# Altium PCB OpenRex_V1I1_PCB.PcbDoc (part 10 of 12)
Units mm, origin at the board's own origin, x right, y up, seen from the top; angles counter-clockwise.
Board outline 70 x 95 mm, 10 copper layers (L1, L2, L3, L4 (PWR), L5 (PWR), L6 (PWR), L7 (PWR), L8, L9, L10), stack 1.632 mm thick; 1080 components, 708 nets, 3831 pads, 2373 vias.
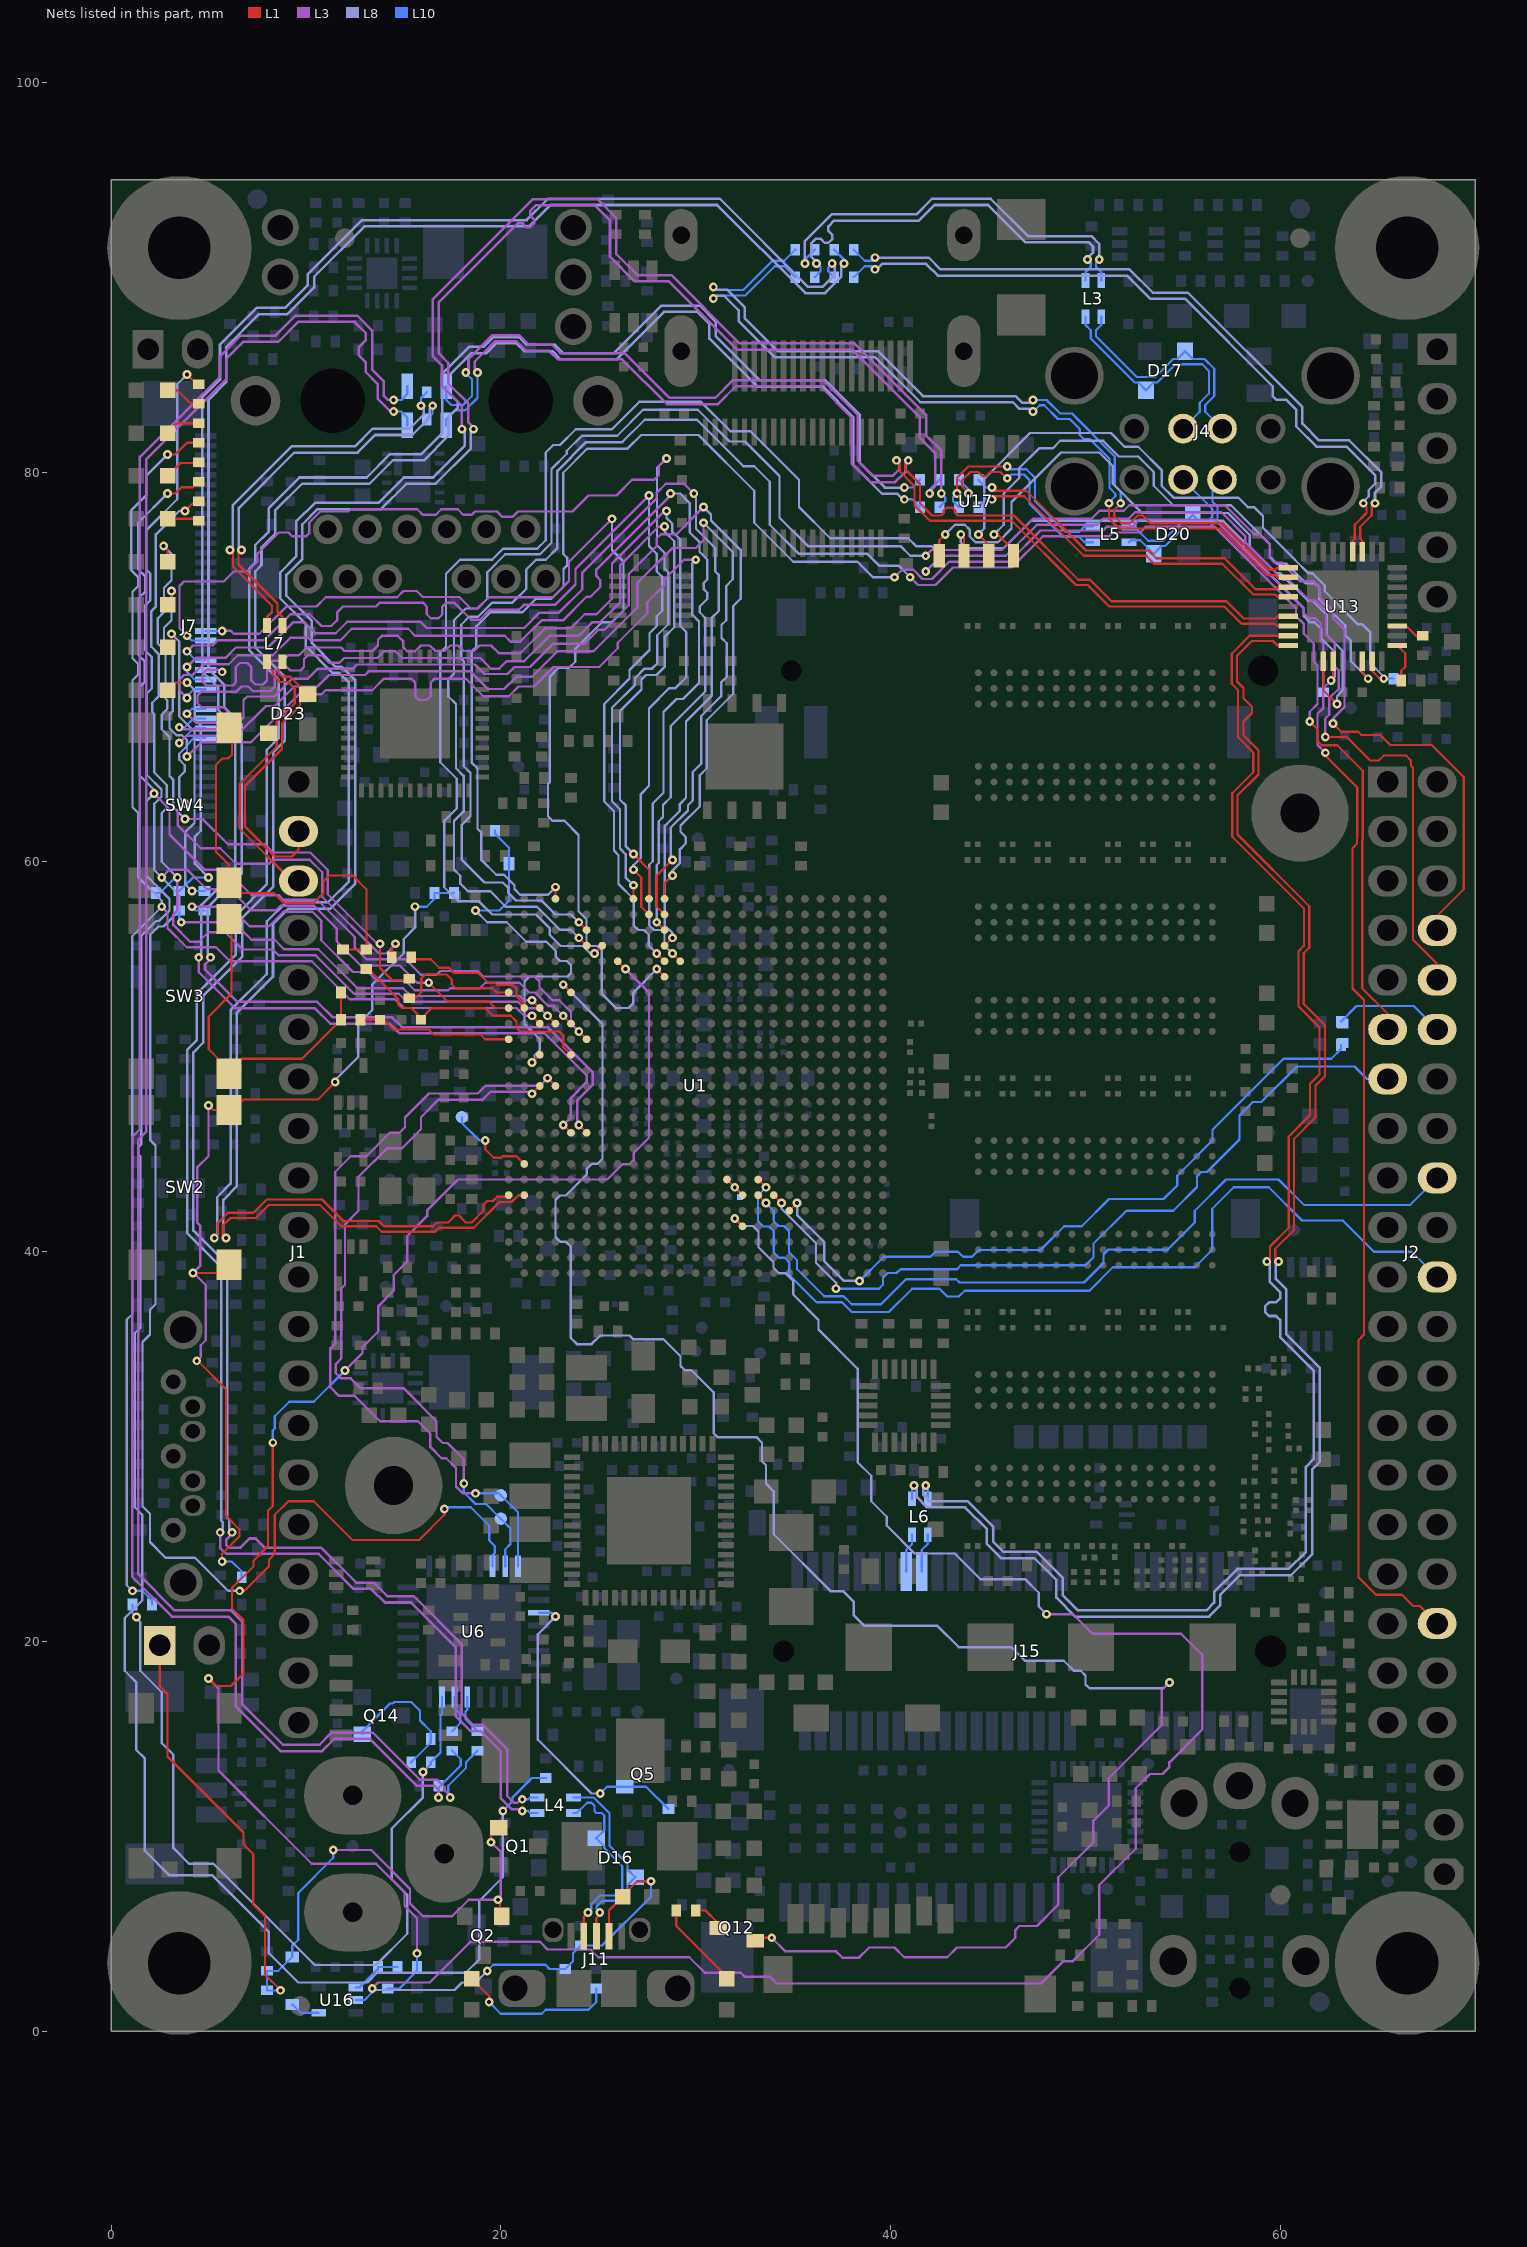
[diagram p18: the nets of this part, all layers, seen from the top]

## Via types
v1: diameter 0.45, hole 0.2, L1 to L10, tented both sides, 2369 vias
v2: diameter 1, hole 0.5, L1 to L10, tented top, 4 vias

## Nets (pads, with @x,y where several pads share a name; then routed paths per layer and width w, separated by ;. In a path a pad name is that pad's centre, name@x,y a point inside that pad or via, vN(x,y) a via of type N, cw(c..) or ccw(c..) an arc to the next point about the centre after c; other vN are vias at no path point) (continued)
UART2_RXD: TP30.1 U1.D13 U6.32 | length 40.9
  L1 w0.114: v1(22.4,48.9) U1.D13@22.8,48.5
  L3 w0.12: v1(18.7,27.6) 18.056,27.6 17.702,27.954 17.702,28.898 17.2,29.4 16.956,29.4 16.385,29.971 16.385,30.659 15.744,31.3 13.8,31.3 12.5,32.6 11.7,32.6 11.255,33.045 11.255,35.047 11.5,35.292 11.5,44.1 12.3,44.9 13.1,44.9 14.3,46.1 14.8,46.1 15.085,46.385 15.085,46.885 16.315,48.115 18.815,48.115 19.215,48.515 22.015,48.515 v1(22.4,48.9)
  L10 w0.114: v1(18.7,27.6) 19.9,27.6 TP30.1@20,27.5 20.875,26.625 U6.32@20.875,23.85
UART2_TXD: TP29.1 U1.C13 U6.31 | length 38
  L1 w0.114: v1(21.6,48.1) U1.C13@22,48.5
  L3 w0.12: v1(18.1,28.1) 18.1,29.344 17.259,30.185 17.015,30.185 16.7,30.5 16.7,31.3 15,33 12.8,33 12.3,33.5 11.8,33.5 11.535,33.765 11.535,34.235 11.815,34.515 11.815,38.115 12,38.3 12,41.4 12.7,42.1 12.7,43.844 14.156,45.3 14.914,45.3 15.9,46.286 15.9,46.9 16.8,47.8 19.068,47.8 19.47,48.202 21.498,48.202 v1(21.6,48.1)
  L10 w0.114: v1(18.1,28.1) 18.1,27.656 18.7,27.056 19.244,27.056 TP29.1@20,26.3 20.5,25.8 20.5,25 20.225,24.725 U6.31@20.225,23.85
UART3_CTS: J2.36 U1.D25 | length 132.1
  L1 w0.114: U1.D25@22.8,58.1 v1(22.8,58.7) ; v1(62.3,65.6) 62.3,65.456 63.94,63.816 63.94,61.282 63.92,61.262 63.92,60.924 63.7,60.704 63.7,53.5 64.285,52.915 64.285,35.745 64,35.46 64,23.3 64.9,22.4 66.23,22.4 66.815,21.815 67.145,21.815 J2.36@68.04,20.92
  L3 w0.12: v1(40.2,74.6) 40.585,74.985 41.171,74.985 41.641,74.515 42.115,74.515 43,75.4 46.083,75.4 47.683,77 50.9,77 51.1,77.2 52.4,77.2 52.767,77.567 56.637,77.567 61.2,73.004 61.2,72.756 61.456,72.5 61.8,72.5 62.056,72.244 62.056,71.344 62.2,71.2 62.2,67.9 61.9,67.6 61.9,66 v1(62.3,65.6)
  L8 w0.12: v1(22.8,58.7) 22.415,58.315 20.985,58.315 20.7,58.6 20.7,58.8 20.16,59.34 19.76,59.34 19,60.1 19,61.5 18.8,61.7 18.8,64.8 18.5,65.1 18.5,70.806 18.735,71.041 18.735,72.079 19.456,72.8 21.1,72.8 21.8,73.5 22.6,73.5 23.218,74.118 23.218,75.018 23.4,75.2 23.4,75.6 23.2,75.8 23.2,79.964 24.436,81.2 26.5,81.2 27.2,81.9 30.144,81.9 33,79.044 33,77.4 35,75.4 38.3,75.4 39.1,74.6 v1(40.2,74.6)
UART3_RTS: J2.11 U1.F23 | length 102.7
  L1 w0.114: v1(24,56.9) U1.F23@24.4,56.5 ; v1(61.5,67.2) 61.9,66.8 61.9,66.2 62.115,65.985 62.915,65.985 64.22,64.68 64.22,61.166 64.2,61.146 64.2,53.5 65.5,52.2 J2.11@65.5,51.4
  L3 w0.12: v1(41,74.6) 41.4,74.2 42.3,74.2 43.2,75.1 46.2,75.1 47.8,76.7 51.2,76.7 51.4,76.9 52.8,76.9 53.1,77.2 56.608,77.2 60.8,73.008 60.8,72.6 61.2,72.2 61.2,71.7 61.71,71.19 61.71,70.28 61.9,70.09 61.9,68.1 61.5,67.7 v1(61.5,67.2)
  L8 w0.12: v1(24,56.9) 23.6,57.3 22.8,57.3 22.08,58.02 20.78,58.02 20.385,58.415 20.385,58.659 20.1,58.944 19.156,58.944 18,60.1 18,61.9 18.445,62.345 18.445,64.555 18.1,64.9 18.1,70.3 17.965,70.435 17.965,72.165 18.37,72.57 18.83,72.57 19.56,73.3 20.6,73.3 21.3,74 21.3,75 21.8,75.5 22.3,75.5 22.9,76.1 22.9,80.06 24.374,81.533 26.233,81.533 27.385,82.685 30.059,82.685 32.444,80.3 33,80.3 33.8,79.5 33.8,77.3 35.3,75.8 38.804,75.8 39.404,75.2 40.4,75.2 v1(41,74.6)
UART3_RXD: J2.10 U1.G22 | length 111.4
  L1 w0.114: v1(24.8,55.3) U1.G22@25.2,55.7 ; v1(62.3,66.4) 63.4,66.4 64.6,65.2 65.044,65.2 65.294,65.45 66.45,65.45 66.7,65.2 66.7,64.926 66.8,64.826 66.8,56 68.04,54.76 J2.10@68.04,53.94
  L3 w0.12: v1(41.8,74.9) 42.6,75.7 45.9,75.7 47.5,77.3 50.6,77.3 50.9,77.6 52.2,77.6 52.533,77.933 56.967,77.933 58.185,76.715 58.185,76.415 60.127,74.473 60.427,74.473 61.5,73.4 61.8,73.4 62.336,72.864 62.336,71.664 62.793,71.207 62.793,70.007 62.985,69.815 62.985,68.885 62.5,68.4 62.5,67.552 62.3,67.352 v1(62.3,66.4)
  L8 w0.12: v1(24.8,55.3) 24.59,55.3 24.205,55.685 23.071,55.685 22.5,56.256 22.5,56.6 21.8,57.3 19.556,57.3 18.885,57.971 18.885,57.985 17.815,57.985 17.1,58.7 17.1,62.1 17.735,62.735 17.735,64.265 16.895,65.105 16.895,70.751 17.185,71.041 17.185,74.785 17.9,75.5 19.551,75.5 20.111,76.06 21.86,76.06 22.3,76.5 22.3,81 22.685,81.385 23.029,81.385 23.844,82.2 25.7,82.2 27.1,83.6 30.267,83.6 31.767,82.1 32.8,82.1 35.3,79.6 35.3,78.2 36.9,76.6 40.9,76.6 41.3,76.2 42.1,76.2 42.3,76 42.3,75.4 v1(41.8,74.9)
UART3_TXD: J2.8 U1.F22 | length 105.7
  L1 w0.114: v1(24,56.1) U1.F22@24.4,55.7 ; v1(62.7,67.1) 63.12,66.68 63.976,66.68 64.141,66.515 65.111,66.515 65.626,66 67.756,66 69.4,64.356 69.4,58.6 68.04,57.24 J2.8@68.04,56.48
  L3 w0.12: v1(41.8,75.7) 42.1,76 45.7,76 47.3,77.6 50.3,77.6 50.715,78.015 51.959,78.015 52.244,78.3 57.155,78.3 58.655,76.8 58.944,76.8 59.456,76.289 59.456,75.6 59.7,75.356 60.044,75.356 61,74.4 61.7,74.4 62,74.1 62,73.6 62.7,72.9 62.7,72.5 63.285,71.915 63.285,67.941 62.7,67.356 v1(62.7,67.1)
  L8 w0.12: v1(24,56.1) 23.585,56.515 23.041,56.515 21.856,57.7 20.256,57.7 19.456,58.5 18.3,58.5 17.915,58.885 17.915,59.285 17.6,59.6 17.6,62.1 18.09,62.59 18.09,64.41 17.7,64.8 17.7,68.1 17.3,68.5 17.3,69.35 17.6,69.65 17.6,72.4 18.2,73 18.8,73 19.3,73.5 19.3,74.853 20.227,75.78 22.007,75.78 22.6,76.373 22.6,80.156 23.385,80.941 23.385,81.089 24.163,81.867 25.967,81.867 27.3,83.2 30.1,83.2 31.732,81.568 32.532,81.568 34.3,79.8 34.3,77.656 35.756,76.2 40.5,76.2 41,75.7 v1(41.8,75.7)
UART4_RXD: J2.13 U1.V6 | length 41.1
  L1 w0.114: U1.V6@34,42.9 v1(34.4,42.5)
  L8 w0.12: v1(34.4,42.5) 34.4,42.2 36.168,40.432 36.168,39.432 37.2,38.4 v1(37.2,38.1)
  L10 w0.114: v1(37.2,38.1) 39.4,38.1 39.6,38.3 39.6,38.644 39.856,38.9 40.3,38.9 40.5,39.1 43.4,39.1 43.6,39.3 50,39.3 50.4,39.7 50.4,40.4 52.1,42.1 54.5,42.1 55.715,43.315 55.715,43.859 55.941,44.085 56.229,44.085 57.9,45.756 57.9,46.994 58.591,47.685 59.029,47.685 60.844,49.5 63.8,49.5 64.44,48.86 J2.13@65.5,48.86
UART4_TXD: R366.1 R367.1 U1.W5 | length 37
  L1 w0.114: U1.W5@34.8,42.1 v1(35.2,42.5)
  L8 w0.12: v1(35.2,42.5) 35.2,41.88 36.6,40.48 36.6,39.5 37.6,38.5 v1(38.4,38.5)
  L10 w0.114: v1(38.4,38.5) 39.64,39.74 42.04,39.74 42.3,40 43.456,40 43.716,39.74 44.17,39.74 44.515,40.085 47.685,40.085 48.9,41.3 49.8,41.3 51.2,42.7 54,42.7 54.7,43.4 54.7,43.9 56.515,45.715 56.515,46.259 60.156,49.9 62.6,49.9 63.1,50.4 R367.1@63.1,50.6
UART4_TXD_R: J2.12 R366.2 R368.2 | length 5.8
  L10 w0.114: R368.2@63.1,51.8 63.9,52.6 66.84,52.6 J2.12@68.04,51.4
UART5_RXD: J2.18 U1.U6 | length 42.9
  L1 w0.114: U1.U6@33.2,42.9 v1(33.6,42.5)
  L10 w0.114: v1(33.6,42.5) 34,42.1 34,41.6 34.015,41.585 34.015,41.541 34.241,41.315 34.529,41.315 34.785,41.059 34.785,39.971 35.2,39.556 35.2,39.1 36.585,37.715 37.585,37.715 38,37.3 39.5,37.3 40.785,38.585 43.359,38.585 43.529,38.415 49.915,38.415 50.915,39.415 50.915,39.859 51.17,40.115 51.459,40.115 51.474,40.1 54.2,40.1 55.6,41.5 55.6,42.1 57.2,43.7 59.9,43.7 61.2,42.4 66.66,42.4 J2.18@68.04,43.78
UART5_TXD: J2.22 U1.U7 | length 46.4
  L1 w0.114: U1.U7@33.2,43.7 v1(33.6,43.3)
  L10 w0.114: v1(33.6,43.3) 33.2,42.9 33.2,41.556 33.471,41.285 33.759,41.285 34,41.044 34,39.956 34.271,39.685 34.559,39.685 34.8,39.444 34.8,38.8 36.2,37.4 37.5,37.4 38,36.9 39.9,36.9 41.1,38.1 42.5,38.1 42.9,37.7 43.5,37.7 43.8,38 50.2,38 51.4,39.2 55.6,39.2 56.5,40.1 56.5,42.2 57.6,43.3 59.4,43.3 61.1,41.6 63.2,41.6 64.8,40 66.74,40 J2.22@68.04,38.7
USB0_CHD: TP26.1 U1.B8 | length 4.7
  L1 w0.114: v1(19.2,45.7) 19.2,45.256 19.641,44.815 20.015,44.815 20.1,44.9 20.8,44.9 U1.B8@21.2,44.5
  L10 w0.114: TP26.1@18,46.9 18,46.6 18.9,45.7 v1(19.2,45.7)
USB0_ID: D19.1 J11.4 R198.1 R199.2 U1.T4 U16.2 | length 119.4
  L1 w0.114: J11.4@25.55,4.875 25.55,6.2 D19.1@26.25,6.9 26.25,6.95 27,7.7 v1(27.7,7.7) ; v1(32,41.7) U1.T4@32.4,41.3
  L3 w0.12: v1(13.4,2.2) 13.7,2.5 16.356,2.5 18.456,4.6 22,4.6 22.4,4.2 24.6,4.2 25,3.8 29.668,3.8 30.468,3 32.305,3 32.5,2.805 33.795,2.805 34.15,2.45 47.71,2.45 48.86,3.6 49.344,3.6 50.7,4.956 50.7,7.5 52.569,9.369 52.569,12.469 53.3,13.2 53.944,13.2 54.3,13.556 54.3,13.796 55.985,15.481 55.985,19.315 54.9,20.4 50.355,20.4 49.355,21.4 v1(48,21.4)
  L8 w0.12: v1(13.4,2.2) 13.485,2.115 17.615,2.115 18,2.5 18.7,2.5 v1(19.3,3.1) ; v1(32,41.7) 32.385,41.315 32.929,41.315 33.215,41.029 33.215,40.229 33.985,39.459 33.985,39.171 34.256,38.9 34.6,38.9 35,38.5 35,37.8 36.3,36.5 36.3,36 38.315,33.985 38.315,29.185 39,28.5 39,27.196 39.8,26.396 39.8,25.944 41.229,24.515 43.285,24.515 44.6,23.2 46.896,23.2 47.6,22.496 47.6,21.8 v1(48,21.4)
  L10 w0.114: U16.2@12.55,1.6 13,1.6 13.4,2 v1(13.4,2.2) ; v1(19.3,3.1) 19.615,3.415 22.285,3.415 22.5,3.2 R199.2@23.3,3.2 23.7,3.6 23.7,4 R198.1@24.1,4.4 25.194,4.4 27.7,6.906 v1(27.7,7.7)
USB0_ID_BUFF: D27.1 U16.4 | length 1.5
  L10 w0.114: D27.1@9.3,1.381 9.731,0.95 U16.4@10.65,0.95
USB0_ID_BUFF_EN: R304.2 R305.2 U1.H21 | length 77.2
  L1 w0.114: v1(5,18.1) 5.385,17.715 6.159,17.715 6.8,18.356 6.8,21.1 6.2,21.7 6.2,22.744 7.315,23.859 7.315,24.159 8.05,24.894 8.05,26.706 8.3,26.956 v1(8.3,30.2) ; U1.H21@26,54.9 v1(26.4,54.5)
  L3 w0.12: v1(5,18.1) 5.515,17.585 5.515,13.385 10.3,8.6 13.6,8.6 15.06,7.14 15.06,6.444 15.7,5.804 v1(15.7,4) ; v1(12,33.9) 12.9,34.8 12.9,35.1 13.715,35.915 13.715,37.215 14.5,38 14.5,38.8 15.195,39.495 15.195,40.805 16.215,41.825 16.215,42.115 17.8,43.7 25.456,43.7 26.241,44.485 26.585,44.485 26.815,44.715 26.815,45.059 27.6,45.844 27.6,53.3 v1(26.4,54.5)
  L10 w0.114: v1(8.3,30.2) 8.3,30.828 8.4,30.928 8.4,31.556 9.144,32.3 10.4,32.3 v1(12,33.9) ; R305.2@14.2,2.2 14.8,2.2 15.7,3.1 R304.2@15.7,3.3 v1(15.7,4)
USB0_ID_BUFF_EN_R: R155.1 R304.1 U16.1 | length 2.6
  L10 w0.114: U16.1@12.55,2.25 12.75,2.25 13.7,3.2 R155.1@13.7,3.3 R304.1@14.7,3.3
USB0_N: R322.2 R323.2 U1.B6 | length 117.6
  L1 w0.114: v1(5.9,40.7) 5.737,40.863 5.737,41.337 6.126,41.726 7.426,41.726 8.1,42.4 10.713,42.4 11.813,41.3 13.613,41.3 13.887,41.026 16.626,41.026 16.826,41.226 18.613,41.226 19.93,42.543 20.548,42.543 20.905,42.9 U1.B6@21.2,42.9
  L3 w0.13: v1(18.6,82.2) 18.6,82.279 18.32,82.559 18.32,83.533 17.3,84.553 17.3,85.604 16.82,86.084 16.82,88.72 20.872,92.772 21.1,92.772 21.304,92.568 21.504,92.568 21.704,92.768 21.704,92.968 21.5,93.172 21.5,93.4 21.78,93.68 24.82,93.68 25.6,92.9 25.6,91.047 26.867,89.78 28.62,89.78 32.12,86.28 38.02,86.28 41.5,82.8 41.5,81.747 42.28,80.967 42.28,79.259 42,78.979 v1(42,78.9)
  L8 w0.13: v1(5.9,40.7) 5.76,40.84 5.76,42.66 6.46,43.36 6.46,52.26 8.31,54.11 8.31,56.81 9.1,57.6 11.253,57.6 12.52,58.867 12.52,69.333 11.833,70.02 11.5,70.02 10.3,71.22 10.3,72.353 9,73.653 9,74.72 9.82,75.54 9.82,77.32 10.6,78.1 13.853,78.1 15.153,79.4 16.653,79.4 18.46,81.207 18.46,82.06 v1(18.6,82.2)
  L10 w0.114: v1(42,78.9) 42,79.1 R323.2@42.5,79.6
USB0_OTG_L_N: D16.2 J11.2 L4.2 | length 10.4
  L1 w0.114: J11.2@24.25,4.875 24.25,5.875 v1(24.475,6.1)
  L10 w0.114: L4.2@23.725,11.2 23.9,11.2 24.426,11.726 24.646,11.726 24.8,11.572 24.8,11.3 24.9,11.2 25.172,11.2 25.3,11.072 25.3,10.3 D16.2@24.9,9.9 25.3,9.5 25.3,9.4 26.226,8.474 26.226,7.313 25.887,6.974 25.099,6.974 24.638,6.513 24.638,6.263 v1(24.475,6.1)
USB0_OTG_L_P: D16.4 J11.3 L4.1 | length 10.5
  L1 w0.114: J11.3@24.9,4.875 24.9,5.797 25.075,5.972 v1(25.075,6.1)
  L10 w0.114: L4.1@23.725,12 24.76,12 25.574,11.186 25.574,9.513 26.5,8.587 26.5,8.3 D16.4@26.9,7.9 26.5,7.5 26.5,7.2 26,6.7 25.212,6.7 24.912,6.4 24.912,6.263 v1(25.075,6.1)
USB0_OTG_N: L4.3 R323.1 | length 128.6
  L3 w0.13: v1(5.6,25.6) 5.6,24.8 5.9,24.5 10.647,24.5 12.447,22.7 13.347,22.7 14.047,22 15.4,22 17.68,19.72 17.68,16.167 18.447,15.4 18.947,15.4 20,14.347 20,11.952 20.552,11.4 21,11.4 v1(21.1,11.3)
  L8 w0.13: v1(5.6,25.6) 5.74,25.74 5.74,26.112 5.646,26.206 5.646,39.205 3.9,40.952 3.9,50.353 4.4,50.853 4.4,53.253 6.4,55.253 6.4,57.253 8,58.853 8,65.753 8.6,66.353 8.6,69.347 7.08,70.867 7.08,75.033 7.4,75.353 7.4,76.253 8.1,76.953 8.1,78.153 9.667,79.72 13.12,79.72 14.32,80.92 15.92,80.92 17,82 17,85.053 18.367,86.42 19.12,86.42 19.62,86.92 20.933,86.92 21.333,86.52 22.78,86.52 23.2,86.1 25.8,86.1 28.235,88.535 30.218,88.535 31.02,87.733 31.02,86.98 33.3,84.7 36.653,84.7 38.41,82.943 38.41,80.49 39.7,79.2 v1(40.7,79.2)
  L10 w0.114: v1(21.1,11.3) 21.41,11.3 21.51,11.2 L4.3@21.875,11.2 ; v1(40.7,79.2) 41.1,79.2 R323.1@41.5,79.6
USB0_OTG_P: L4.4 R326.1 | length 128.6
  L3 w0.13: v1(6.2,25.6) 6.2,25.521 5.92,25.241 5.92,24.933 6.033,24.82 6.645,24.82 7.108,25.283 7.417,25.283 7.88,24.82 10.78,24.82 12.58,23.02 13.48,23.02 14.18,22.32 15.533,22.32 18,19.853 18,16.3 18.58,15.72 19.08,15.72 20.32,14.48 20.32,12.084 20.684,11.72 20.841,11.72 21.021,11.9 v1(21.1,11.9)
  L8 w0.13: v1(6.2,25.6) 6.06,25.74 6.06,26.244 5.966,26.338 5.966,39.338 4.22,41.084 4.22,50.22 4.72,50.72 4.72,53.12 6.72,55.12 6.72,57.12 8.32,58.72 8.32,65.62 8.92,66.22 8.92,69.48 7.4,71 7.4,74.9 7.72,75.22 7.72,76.12 8.42,76.82 8.42,78.02 9.8,79.4 13.253,79.4 14.453,80.6 16.053,80.6 17.32,81.867 17.32,82.82 17.8,83.3 17.8,83.6 17.32,84.08 17.32,84.92 18.5,86.1 19.253,86.1 19.753,86.6 20.8,86.6 21.2,86.2 22.647,86.2 23.067,85.78 25.933,85.78 28.368,88.215 30.085,88.215 30.7,87.6 30.7,86.847 33.167,84.38 36.52,84.38 38.09,82.81 38.09,80.357 39.567,78.88 40.341,78.88 40.621,78.6 v1(40.7,78.6)
  L10 w0.114: v1(21.1,11.9) 21.41,11.9 21.51,12 L4.4@21.875,12 ; v1(40.7,78.6) 41.1,78.6 R326.1@41.5,78.2
USB0_P: R325.2 R326.2 U1.A6 | length 117.6
  L1 w0.114: v1(5.3,40.7) 5.463,40.863 5.463,41.45 6.013,42 7.313,42 7.987,42.674 10.826,42.674 11.926,41.574 13.726,41.574 14,41.3 16.513,41.3 16.713,41.5 17.3,41.5 17.65,41.85 17.85,41.85 18.2,41.5 18.5,41.5 19.1,42.1 19.1,42.4 19.3,42.6 19.6,42.6 19.817,42.817 20.317,42.817 U1.A6@20.4,42.9
  L3 w0.13: v1(18,82.2) 18,83.4 16.98,84.42 16.98,85.472 16.5,85.952 16.5,88.853 21.647,94 24.953,94 25.92,93.033 25.92,91.18 27,90.1 28.753,90.1 32.253,86.6 38.153,86.6 41.82,82.933 41.82,81.88 42.6,81.1 v1(42.6,78.9)
  L8 w0.13: v1(5.3,40.7) 5.44,40.84 5.44,42.793 6.14,43.493 6.14,52.393 7.99,54.243 7.99,56.943 8.967,57.92 11.12,57.92 12.2,59 12.2,69.2 11.7,69.7 11.367,69.7 9.98,71.087 9.98,72.22 8.68,73.52 8.68,74.853 9.5,75.673 9.5,77.453 10.467,78.42 13.72,78.42 15.02,79.72 16.52,79.72 18.14,81.34 18.14,82.06 v1(18,82.2)
  L10 w0.114: R326.2@42.5,78.2 42.8,78.5 42.8,78.7 v1(42.6,78.9)
USB1_HUB_N: R329.1 U13.30 | length 37
  L1 w0.114: U13.30@64.2,75.9 64.2,76.457 64.087,76.57 64.087,77.187 64.687,77.787 64.687,78.237 v1(64.85,78.4)
  L8 w0.13: v1(39.2,91) 41.953,91 42.553,90.4 52.253,90.4 53.453,89.2 55.253,89.2 61.12,83.333 61.12,82.48 61.98,81.62 63.528,81.62 65.177,79.971 65.177,79.267 64.85,78.94 v1(64.85,78.4)
  L10 w0.114: R329.1@38.1,91.4 38.663,90.837 39.037,90.837 v1(39.2,91)
USB1_HUB_P: R332.1 U13.31 | length 37
  L1 w0.114: U13.31@63.7,75.9 63.7,76.457 63.813,76.57 63.813,77.3 64.413,77.9 64.413,78.237 v1(64.25,78.4)
  L8 w0.13: v1(39.2,90.4) 39.279,90.4 39.559,90.68 41.82,90.68 42.42,90.08 52.12,90.08 53.32,88.88 55.12,88.88 59.6,84.4 59.6,83.9 59.8,83.7 60.3,83.7 60.8,83.2 60.8,82.347 61.847,81.3 63.396,81.3 64.857,79.838 64.857,79.4 64.53,79.073 64.53,78.759 64.25,78.479 v1(64.25,78.4)
  L10 w0.114: R332.1@38.1,90 38.663,90.563 39.037,90.563 v1(39.2,90.4)
USB1_N: R328.2 R329.2 U1.F10 | length 98.4
  L1 w0.114: v1(24,46.5) U1.F10@24.4,46.1
  L3 w0.13: v1(5.1,55.1) 5.1,55.021 4.82,54.741 4.82,54.48 6.48,52.82 10.58,52.82 11.38,52.02 14.424,52.02 14.924,51.52 22.384,51.52 24.72,49.184 24.72,48.572 23.91,47.762 23.91,46.59 v1(24,46.5)
  L8 w0.13: v1(5.1,55.1) 4.96,55.24 4.96,57.66 6.7,59.4 6.7,67.053 5.82,67.933 5.82,69.078 5,69.898 5,83.7 5.91,84.61 5.91,86.41 7.6,88.1 9.053,88.1 10.42,89.467 10.42,90.02 13,92.6 21.453,92.6 22.553,93.7 31.1,93.7 35.62,89.18 36.633,89.18 37.46,90.007 37.46,90.56 v1(37.6,90.7)
  L10 w0.114: R329.2@37.1,91.4 37.6,90.9 v1(37.6,90.7)
USB1_P: R331.2 R332.2 U1.E10 | length 98.4
  L1 w0.114: v1(23.2,46.5) U1.E10@23.6,46.1
  L3 w0.13: v1(4.5,55.1) 4.5,54.347 6.347,52.5 10.447,52.5 11.247,51.7 14.292,51.7 14.792,51.2 22.252,51.2 24.4,49.052 24.4,48.704 23.59,47.894 23.59,46.89 v1(23.2,46.5)
  L8 w0.13: v1(4.5,55.1) 4.64,55.24 4.64,57.793 6.38,59.533 6.38,66.92 5.5,67.8 5.5,68.946 4.68,69.766 4.68,83.833 5.59,84.743 5.59,86.543 7.467,88.42 8.92,88.42 10.1,89.6 10.1,90.153 12.867,92.92 21.32,92.92 22.42,94.02 31.233,94.02 35.753,89.5 36.5,89.5 37.14,90.14 37.14,90.56 v1(37,90.7)
  L10 w0.114: v1(37,90.7) 36.8,90.5 36.8,90.3 R332.2@37.1,90
USB_BOT_L_N: D17.2 J4.2 L3.1 | length 12.6
  L10 w0.114: L3.1@50.8,87.975 50.8,87.543 50.537,87.28 50.537,86.963 52.626,84.874 53.574,84.874 54.5,85.8 54.7,85.8 D17.2@55.1,86.2 55.5,85.8 56.1,85.8 56.6,85.3 56.6,83.9 56.137,83.437 56.137,83.093 J4.2@57,82.23
USB_BOT_L_P: D17.4 J4.3 L3.2 | length 12.6
  L10 w0.114: L3.2@50,87.975 50,87.543 50.263,87.28 50.263,86.85 52.513,84.6 52.7,84.6 D17.4@53.1,84.2 53.5,84.6 53.687,84.6 54.613,85.526 55.987,85.526 56.326,85.187 56.326,84.013 55.863,83.551 55.863,83.093 J4.3@55,82.23
USB_BOT_N: L3.4 R327.1 R328.1 | length 21.1
  L8 w0.13: v1(35.6,90.7) 35.6,91.853 36.967,93.22 41.32,93.22 42.12,94.02 45.133,94.02 47.053,92.1 50.3,92.1 50.7,91.7 v1(50.7,90.9)
  L10 w0.114: v1(35.6,90.7) 35.6,90.9 R328.1@36.1,91.4 ; v1(50.7,90.9) 50.537,90.737 50.537,90.52 50.8,90.257 L3.4@50.8,89.825
USB_BOT_P: L3.3 R330.1 R331.1 | length 21.1
  L8 w0.13: v1(36.2,90.7) 36.2,90.779 35.92,91.059 35.92,91.72 36.172,91.972 36.4,91.972 36.607,91.764 36.807,91.764 37.007,91.964 37.007,92.164 36.8,92.372 36.8,92.6 37.1,92.9 41.453,92.9 42.253,93.7 45,93.7 46.92,91.78 50.167,91.78 50.38,91.567 50.38,91.259 50.1,90.979 v1(50.1,90.9)
  L10 w0.114: R331.1@36.1,90 36.4,90.3 36.4,90.5 v1(36.2,90.7) ; L3.3@50,89.825 50,90.257 50.263,90.52 50.263,90.737 v1(50.1,90.9)
USB_CONNECT_OR_USER_LED_2: R388.1 R389.1 U6.15 | length 42.1
  L8 w0.12: v1@1.3,21.2 1.5,21 1.5,18.5 2.6,17.4 2.6,14.785 3.2,14.185 3.2,9.4 4,8.6 5.256,8.6 10.456,3.4 13.6,3.4 15.2,5 15.2,7 14.4,7.8 14.4,10.4 16,12 v1(16,13.3)
  L10 w0.114: R389.1@1.1,21.9 1.1,21.45 v1(1.3,21.25) ; v1@1.275,21.225 v1@1.3,21.2 ; v1(16,13.3) 16.4,13.7 R388.1@16.4,13.8 16.9,14.3 16.9,16.2 16.975,16.275 U6.15@16.975,17.15
USB_CONNECTN: Q14.1 R386.1 R388.2 | length 7.2
  L10 w0.114: Q14.1@12.9,15.25 12.9,15.4 14.315,16.815 14.459,16.815 14.544,16.9 15.4,16.9 15.85,16.45 15.85,15.95 16.4,15.4 R386.1@16.4,15 16.4,14.8 R388.2@15.4,13.8
USB_HDR_L_N: D23.2 J1.2 L7.2 | length 15
  L1 w0.114: L7.2@8.8,70.1 8.594,69.894 8.594,69.694 8.787,69.5 9.2,69.5 D23.2@10.1,68.6 9.7,68.2 9.7,68.013 8.774,67.087 8.774,65.787 6.874,63.887 6.874,61.813 8.407,60.28 9.28,60.28 9.62,60.62 J1.2@9.62,61.56
USB_HDR_L_P: D23.4 J1.3 L7.1 | length 15
  L1 w0.114: L7.1@8,70.275 8,70.1 8.3,69.8 8.3,69.6 8.674,69.226 9.087,69.226 9.426,68.887 9.426,68.126 8.5,67.2 8.5,67 D23.4@8.1,66.6 8.5,66.2 8.5,65.9 6.6,64 6.6,61.7 9.28,59.02 J1.3@9.62,59.02
USB_HDR_N: L7.3 R194.2 R207.1 | length 20.3
  L1 w0.114: v1(6.7,76) 6.537,75.837 6.537,75.25 8.537,73.25 8.537,72.82 8.8,72.557 L7.3@8.8,72.125
  L8 w0.13: v1(6.7,76) 6.56,76.14 6.56,78.16 9.4,81 12.653,81 13.553,81.9 15.453,81.9 16.36,82.807 16.36,83.26 v1(16.5,83.4)
  L10 w0.114: R194.2@16.2,82.7 16.5,83 v1(16.5,83.4)
USB_HDR_P: L7.4 R297.2 R298.1 | length 20.3
  L1 w0.114: v1(6.1,76) 6.263,75.837 6.263,75.137 8.263,73.137 8.263,72.82 8,72.557 L7.4@8,72.125
  L8 w0.13: v1(6.1,76) 6.24,76.14 6.24,78.293 9.267,81.32 12.52,81.32 13.42,82.22 15.32,82.22 16.04,82.94 16.04,83.26 v1(15.9,83.4)
  L10 w0.114: v1(15.9,83.4) 15.9,83.8 R297.2@16.2,84.1
USB_MCU_N: R207.2 R294.2 R299.2 | length 105.6
  L3 w0.13: v1(14.5,83.1) 14.347,83.1 13.68,83.767 13.68,84.52 13.08,85.12 13.08,85.62 12.72,85.98 12.72,86.42 13.08,86.78 13.08,87.12 12.5,87.7 9.6,87.7 8.58,86.68 6.78,86.68 5.9,85.8 5.9,84.747 1.8,80.647 1.8,46.147 1.4,45.747 1.4,23.453 3.253,21.6 6.153,21.6 6.72,21.033 6.72,16.8 8.82,14.7 10.7,14.7 11.32,15.32 13.428,15.32 15.838,12.91 16.733,12.91 17.12,12.523 17.12,12.359 17.4,12.079 v1(17.4,12)
  L10 w0.114: v1(14.5,83.1) 14.9,83.1 15.2,82.8 R207.2@15.2,82.7 R294.2@15.2,82.4 ; v1(17.4,12) 17.3,12.1 17.3,12.6 18.218,13.518 18.218,13.818 R299.2@18.8,14.4
USB_MCU_P: R295.1 R298.2 R300.2 R387.2 | length 105.6
  L3 w0.13: v1(14.5,83.7) 14.2,83.7 14,83.9 14,84.653 13.4,85.253 13.4,87.253 12.633,88.02 9.467,88.02 8.447,87 6.647,87 5.58,85.933 5.58,84.88 1.48,80.78 1.48,46.28 1.08,45.88 1.08,23.32 3.12,21.28 6.02,21.28 6.4,20.9 6.4,16.667 8.687,14.38 10.833,14.38 11.453,15 13.296,15 15.706,12.59 16.6,12.59 16.8,12.39 v1(16.8,12)
  L10 w0.114: v1(14.5,83.7) 14.9,83.7 15.2,84 R298.2@15.2,84.1 R295.1@15.2,84.4 ; v1(16.8,12) 16.8,12.487 16.856,12.544 17.944,13.631 17.944,13.956 R300.2@17.5,14.4
USB_MCU_R_N: R299.1 U6.13 | length 2
  L10 w0.114: U6.13@18.275,17.15 18.275,16.5 18.185,16.41 18.185,16.015 R299.1@18.8,15.4
USB_MCU_R_P: R300.1 U6.14 | length 2
  L10 w0.114: R300.1@17.5,15.4 17.911,15.811 17.911,16.289 17.625,16.575 U6.14@17.625,17.15
USB_MPCIE_L_N: J15.36 L6.1 | length 2
  L10 w0.114: J15.36@41.6,23.6 41.6,24.7 41.9,25 L6.1@41.9,25.475
USB_MPCIE_L_P: J15.38 L6.2 | length 2
  L10 w0.114: J15.38@40.8,23.6 40.8,24.7 41.1,25 L6.2@41.1,25.475
USB_MPCIE_N: L6.4 U13.8 | length 81.6
  L1 w0.114: v1(59.3,39.5) 59.463,39.663 59.463,40.263 60.426,41.226 60.426,45.913 61.52,47.007 61.52,48.62 62.006,49.106 62.006,51.506 60.92,52.593 60.92,55.42 61.2,55.7 61.2,57.613 57.526,61.287 57.526,63.526 58.6,64.6 58.6,65.613 57.826,66.387 57.826,68.803 57.494,69.135 57.494,70.681 58.413,71.6 U13.8@60.4,71.6
  L8 w0.13: v1(41.8,28) 41.66,27.86 41.66,27.54 42,27.2 43.953,27.2 45.26,25.893 45.26,25.14 45.8,24.6 47.5,24.6 48.82,23.28 48.82,22.38 49.6,21.6 56.2,21.6 56.6,22 56.6,22.533 57.787,23.72 60.42,23.72 61.3,24.6 61.3,28.953 61.7,29.353 61.7,33.9 59.98,35.62 59.98,36.5 59.78,36.7 59.413,36.7 59.213,36.9 59.213,37.2 59.413,37.4 59.78,37.4 59.98,37.6 59.98,37.92 59.44,38.46 59.44,39.36 v1(59.3,39.5)
  L10 w0.114: v1(41.8,28) 41.8,27.89 41.9,27.79 L6.4@41.9,27.325
USB_MPCIE_OC: R284.2 U13.21 | length 1.5
  L1 w0.114: U13.21@66,72.1 66.456,72.1 67.056,71.5 67.1,71.5 R284.2@67.3,71.5
USB_MPCIE_P: L6.3 U13.9 | length 81.6
  L1 w0.114: v1(59.9,39.5) 59.737,39.663 59.737,40.15 60.7,41.113 60.7,45.8 61.794,46.894 61.794,48.506 62.28,48.993 62.28,51.62 61.194,52.706 61.194,55.306 61.474,55.587 61.474,57.726 57.8,61.4 57.8,63.413 58.874,64.487 58.874,65.726 58.1,66.5 58.1,67.2 58.54,67.64 58.54,67.96 58.1,68.4 58.1,68.916 57.768,69.248 57.768,70.568 58.526,71.326 59.617,71.326 59.843,71.1 U13.9@60.4,71.1
  L8 w0.13: v1(41.2,28) 41.34,27.86 41.34,27.407 41.867,26.88 43.82,26.88 44.94,25.76 44.94,25.007 45.667,24.28 47.367,24.28 48.5,23.147 48.5,22.247 49.467,21.28 56.333,21.28 56.92,21.867 56.92,22.4 57.92,23.4 60.553,23.4 61.62,24.467 61.62,28.82 62.02,29.22 62.02,34.033 60.3,35.753 60.3,38.053 59.76,38.593 59.76,39.36 v1(59.9,39.5)
  L10 w0.114: L6.3@41.1,27.325 41.1,27.79 41.2,27.89 v1(41.2,28)
USB_OC: R260.1 U1.R7 U1.T6 | length 1.7
  L1 w0.114: U1.R7@31.6,43.7 v1(32,43.3) U1.T6@32.4,42.9
  L10 w0.114: v1(32,43.3) 32.265,43.035 R260.1@32.265,42.8
USB_OTG_EN: D27.2 JP1.1 Q1.1 Q2.1 R174.2 R214.1 | length 45.5
  L1 w0.114: JP1.1@2.5,19.78 2.5,17.7 2.9,17.3 2.9,14.1 6.8,10.2 6.8,9.6 7.3,9.1 7.3,6.5 7.9,5.9 7.9,2.9 v1(8.7,2.1) ; v1(19.5,9.7) 19.5,10.05 Q1.1@19.9,10.45 ; v1(19.85,6.75) 19.95,6.65 Q2.1@19.95,6
  L3 w0.12: v1(11.4,9.3) 13.345,9.3 15.34,7.305 15.34,6.56 16,5.9 17.5,5.9 18.35,6.75 v1(19.85,6.75) 20,6.9 20,9.2 v1(19.5,9.7)
  L10 w0.114: v1(8.7,2.1) R174.2@8,2.1 R214.1@8,3.1 8.581,3.1 D27.2@9.3,3.819 9.3,4.4 9.6,4.7 9.6,7.1 11.4,8.9 v1(11.4,9.3)
USB_TOP_L_N: D20.2 J4.6 L5.2 | length 8
  L10 w0.114: L5.2@52.225,76.4 52.325,76.5 52.8,76.5 D20.2@53.5,75.8 53.9,76.2 54.087,76.2 55.013,77.126 56.326,77.126 56.774,77.574 56.774,78.223 56.515,78.482 56.515,79.125 J4.6@57,79.61
USB_TOP_L_P: D20.4 J4.7 L5.1 | length 8
  L10 w0.114: L5.1@52.225,77.2 52.487,77.2 53.213,76.474 53.974,76.474 54.9,77.4 55.1,77.4 D20.4@55.5,77.8 55.9,77.4 56.213,77.4 56.5,77.687 56.5,78.11 J4.7@55,79.61
USB_TOP_N: L5.3 R321.1 R322.1 | length 11.1
  L1 w0.114: v1(44,78.9) 44,78.925 43.674,79.251 43.674,79.587 44.093,80.006 44.494,80.006 44.7,79.8 44.9,79.8 45.106,80.006 45.629,80.006 45.955,79.68 v1(45.98,79.68)
  L10 w0.114: R322.1@43.5,79.6 44,79.1 v1(44,78.9) ; v1(45.98,79.68) 46.005,79.68 46.195,79.87 46.843,79.87 47.126,79.587 47.126,78.387 48.85,76.663 49.68,76.663 49.943,76.4 L5.3@50.375,76.4
USB_TOP_P: L5.4 R324.1 R325.1 | length 11.1
  L1 w0.114: v1(43.4,78.9) 43.4,79.7 43.98,80.28 v1(45.98,80.28)
  L10 w0.114: v1(43.4,78.9) 43.2,78.7 43.2,78.5 R325.1@43.5,78.2 ; v1(45.98,80.28) 46.116,80.144 46.956,80.144 47.4,79.7 47.4,78.5 48.963,76.937 49.68,76.937 49.943,77.2 L5.4@50.375,77.2
USBDN1_N: R327.2 U13.1 | length 43.5
  L1 w0.114: v1(51.8,78.4) 51.8,78.375 51.474,78.049 51.474,77.726 51.826,77.374 52.274,77.374 52.67,77.77 52.93,77.77 53.326,77.374 57.026,77.374 59.413,74.987 59.73,74.987 59.843,75.1 U13.1@60.4,75.1
  L8 w0.13: v1(30.9,89.5) 31.04,89.36 31.593,89.36 32.52,88.433 32.52,87.88 34.2,86.2 39.353,86.2 41.653,83.9 46.4,83.9 46.74,83.56 47.16,83.56 v1(47.3,83.7)
  L10 w0.114: v1(30.9,89.5) 31.063,89.337 32.437,89.337 33.937,90.837 34.537,90.837 R327.2@35.1,91.4 ; v1(47.3,83.7) 48,83.7 48.7,83 49.3,83 51.5,80.8 51.5,79.3 51.8,79 v1(51.8,78.4)
USBDN1_OC: R285.1 U13.13 U17.2 | length 28.3
  L1 w0.114: v1(43.6,76.8) 43.765,76.635 U17.2@43.765,75.7 ; v1(62.6,69.3) 62.7,69.4 U13.13@62.7,70.3
  L8 w0.12: v1(43.6,76.8) 43.6,76.4 43.9,76.1 45.8,76.1 47.2,77.5 57.056,77.5 58.12,76.436 58.12,76.084 61.2,73.004 61.2,72.6 61.515,72.285 61.759,72.285 62.085,71.959 62.085,71.471 62.8,70.756 62.8,69.5 v1(62.6,69.3)
  L10 w0.114: R285.1@62.2,68.7 62.2,68.9 v1(62.6,69.3)
USBDN1_P: R330.2 U13.2 | length 43.5
  L1 w0.114: v1(51.2,78.4) 51.2,77.613 51.713,77.1 56.913,77.1 59.3,74.713 59.73,74.713 59.843,74.6 U13.2@60.4,74.6
  L8 w0.13: v1(30.9,88.9) 31.04,89.04 31.46,89.04 32.2,88.3 32.2,87.747 34.067,85.88 39.22,85.88 41.52,83.58 46.267,83.58 46.607,83.24 47.16,83.24 v1(47.3,83.1)
  L10 w0.114: v1(30.9,88.9) 31.063,89.063 32.55,89.063 34.05,90.563 34.537,90.563 R330.2@35.1,90 ; v1(47.3,83.1) 47.325,83.1 47.651,83.426 47.887,83.426 48.587,82.726 49.187,82.726 49.7,82.213 49.7,81.9 49.9,81.7 50.213,81.7 51.226,80.687 51.226,79.187 51.526,78.887 51.526,78.751 51.2,78.425 v1(51.2,78.4)
USBDN1_PWR_EN: U13.12 U17.1 | length 36.1
  L1 w0.114: U17.1@42.495,75.7 42.495,76.495 v1@42.795,76.795 ; U13.12@62.2,70.3 62.2,68.8 v1(62.9,68.1)
  L8 w0.12: v1@42.795,76.795 43.3,77.3 43.8,77.3 44.05,77.05 44.05,76.706 44.356,76.4 45.5,76.4 46.2,77.1 46.2,78.46 48.74,81 50.7,81 51.4,80.3 51.4,79.4 52.9,77.9 57.3,77.9 58.415,76.785 58.415,76.191 59.806,74.8 60,74.8 61.4,73.4 61.644,73.4 62.375,72.669 62.375,71.625 63.2,70.8 63.2,68.8 62.9,68.5 v1(62.9,68.1)
  other v1: 42.8,76.8
USBDN2_N: R321.2 U13.3 | length 18.3
  L1 w0.114: v1(45.2,79.2) 45.363,79.037 46.963,79.037 50.026,75.974 53.226,75.974 53.626,75.574 57.126,75.574 58.713,73.987 59.73,73.987 59.843,74.1 U13.3@60.4,74.1
  L10 w0.114: R321.2@44.5,79.6 44.9,79.2 v1(45.2,79.2)
USBDN2_OC: R286.1 U13.17 U17.3 | length 34.7
  L1 w0.114: v1(44.5,76.8) 45.035,76.265 U17.3@45.035,75.7 ; U13.17@64.7,70.3 64.7,69.8 65.1,69.4 v1(65.3,69.4)
  L8 w0.12: v1(44.5,76.8) 44.8,77.1 44.8,79.644 47.156,82 51.3,82 52,81.3 52.7,81.3 53.9,80.1 53.9,79.3 54.512,78.688 57.834,78.688 58.322,78.2 58.644,78.2 59.1,77.744 59.1,77.144 60.73,75.515 60.73,75.5 61.43,74.8 61.655,74.8 62.275,74.18 62.275,73.881 63.971,72.185 64.205,72.185 64.6,71.79 64.6,70.2 65.3,69.5 v1(65.3,69.4)
  L10 w0.114: v1(65.3,69.4) R286.1@65.8,69.4
USBDN2_P: R324.2 U13.4 | length 18.3
  L1 w0.114: v1(45.2,78.6) 45.363,78.763 46.85,78.763 49.913,75.7 53.113,75.7 53.513,75.3 57.013,75.3 58.6,73.713 59.73,73.713 59.843,73.6 U13.4@60.4,73.6
  L10 w0.114: R324.2@44.5,78.2 44.9,78.6 v1(45.2,78.6)
USBDN2_PWR_EN: U13.16 U17.4 | length 32.7
  L1 w0.114: v1(45.3,76.8) 45.5,76.8 46.305,75.995 U17.4@46.305,75.7 ; 64.2,69.744 U13.16@64.2,70.3 64.2,69.7 v1(64.5,69.4)
  L8 w0.12: v1(45.3,76.8) 45.8,77.3 45.8,78.9 46.6,79.7 46.6,80.2 47.615,81.215 48.315,81.215 48.7,81.6 50.9,81.6 51.7,80.8 52.7,80.8 53.5,80 53.5,79.3 54.5,78.3 57.456,78.3 59.465,76.291 59.465,75.635 59.8,75.3 60.3,75.3 61.315,74.285 61.759,74.285 61.985,74.059 61.985,73.47 63.315,72.14 63.315,71.641 63.6,71.356 63.6,70.3 v1(64.5,69.4)
USBDN3_N: R194.1 R294.1 U13.6 | length 57.2
  L1 w0.114: v1(40.9,80.6) 40.737,80.437 40.737,80.15 41.5,79.387 41.5,78.4 42.126,77.774 42.6,77.774 42.726,77.9 42.726,78.015 42.876,78.165 43.176,78.165 43.326,78.015 43.326,77.9 43.452,77.774 46.326,77.774 49.626,74.474 50.226,74.474 51.326,73.374 57.226,73.374 58.113,72.487 59.73,72.487 59.843,72.6 U13.6@60.4,72.6
  L3 w0.13: v1(18.8,85.1) 18.66,85.24 18.66,85.66 19.7,86.7 20.8,86.7 21.28,86.22 22.48,86.22 22.92,85.78 26.22,85.78 28.52,83.48 31.133,83.48 32.053,84.4 36.4,84.4 38,82.8 38,80.447 38.967,79.48 40.233,79.48 40.76,80.007 40.76,80.46 v1(40.9,80.6)
  L10 w0.114: R294.1@17.2,82.4 R194.1@17.2,82.7 17.666,83.166 18.166,83.166 18.8,83.8 v1(18.8,85.1)
USBDN3_OC: R283.2 U13.19 | length 2
  L1 w0.114: U13.19@66,71.1 66.4,70.7 66.4,70 66.2,69.8 R283.2@66.2,69.3
USBDN3_P: R295.2 R297.1 U13.7 | length 57.2
  L1 w0.114: v1(40.3,80.6) 40.463,80.437 40.463,80.037 41.226,79.274 41.226,78.287 42.013,77.5 46.213,77.5 49.513,74.2 50.113,74.2 51.213,73.1 57.113,73.1 58,72.213 59.73,72.213 59.843,72.1 U13.7@60.4,72.1
  L3 w0.13: v1(18.2,85.1) 18.34,85.24 18.34,85.793 19.567,87.02 20.933,87.02 21.413,86.54 22.613,86.54 23.053,86.1 26.353,86.1 28.653,83.8 31,83.8 31.92,84.72 36.533,84.72 38.32,82.933 38.32,80.58 39.1,79.8 40.1,79.8 40.44,80.14 40.44,80.46 v1(40.3,80.6)
  L10 w0.114: R295.2@17.2,84.4 R297.1@17.2,84.1 17.2,83.7 17.46,83.44 18.053,83.44 18.526,83.913 18.526,84.749 18.2,85.075 v1(18.2,85.1)
USER_BTN_1: D35.2 R381.1 U1.C15 | length 20.2
  L1 w0.114: v1(21.6,49.7) U1.C15@22,50.1
  L8 w0.12: v1(18.7,57.5) 19.3,56.9 20.3,56.9 21.3,55.9 22.344,55.9 22.815,55.429 22.815,55.141 23.041,54.915 23.385,54.915 23.6,54.7 23.6,54.3 23.415,54.115 21.471,54.115 21.215,53.859 21.215,51.685 22,50.9 22,50.356 21.725,50.081 21.725,49.825 v1(21.6,49.7)
  L10 w0.114: v1(18.7,57.5) 19.919,57.5 20.419,58 D35.2@20.419,59.9 20.419,60.725 19.7,61.444 R381.1@19.7,61.6
USER_BTN_1_R: R147.1 R149.2 R380.1 SW2.1 SW2.2 | length 49.5
  L1 w0.114: v1(4.2,38.9) 5.525,38.9 SW2.2@6.05,39.425 ; v1(4.4,34.4) 4.444,34.4 5.9,32.944 5.9,26.444 6.585,25.759 6.585,25.385 5.7,24.5 v1(5.7,24.1) ; v1(5,47.5) 5.225,47.275 SW2.1@6.05,47.275 6.275,47.275 6.8,47.8 10.6,47.8 v1(11.5,48.7)
  L3 w0.12: v1(4.4,34.4) 4.6,34.6 4.6,35.2 4.86,35.46 4.86,38.284 4.244,38.9 v1(4.2,38.9) 4.585,39.285 4.585,41.321 4.415,41.491 4.415,44.315 5,44.9 v1(5,47.5)
  L8 w0.12: v1@11.5,48.8 12.685,49.985 12.685,51.685 13.4,52.4 13.4,53.7 15.015,55.315 15.015,56.044 15.6,56.629 v1(15.6,57.7)
  L10 w0.114: v1(5.7,24.1) 6.2,24.1 6.7,23.6 R380.1@6.7,23.3 ; v1(15.6,57.7) 16.2,57.7 16.6,58.1 R147.1@16.6,58.4 R149.2@17.6,58.4
USER_BTN_2: C315.1 R254.1 U1.A16 | length 8
  L1 w0.114: R254.1@12.8,51.9 C315.1@13.8,51.9 14,51.9 14.5,51.4 16.3,51.4 16.565,51.135 18.965,51.135 19.2,50.9 U1.A16@20.4,50.9
USER_BTN_2_R: R251.1 R254.2 SW3.1 SW3.2 | length 17.1
  L1 w0.114: SW3.1@6.05,57.075 6.185,56.94 6.185,53.241 5.015,52.071 5.015,50.385 6.05,49.35 6.05,49.225 6.725,49.9 9.8,49.9 R254.2@11.8,51.9 R251.1@11.8,53.3
USER_BTN_3: C316.1 R255.1 U1.E15 | length 13.6
  L1 w0.114: R255.1@13.1,54.5 13.2,54.5 14.735,52.965 14.735,52.674 14.909,52.5 15.4,52.5 15.9,52 C316.1@15.9,51.944 ; C316.1@15.9,51.9 C316.1@15.9,51.944 ; U1.E15@23.6,50.1 23.2,50.5 23.2,51.1 23,51.3 21,51.3 20.8,51.5 20.8,51.809 20.509,52.1 19.6,52.1 19.215,52.485 16.441,52.485 C316.1@15.9,51.944
USER_BTN_3_R: R252.1 R255.2 SW4.1 SW4.2 | length 21.8
  L1 w0.114: SW4.1@6.05,66.875 6.2,66.725 6.2,65.5 6,65.3 5.7,65.3 5.385,64.985 5.385,60.515 6.05,59.85 SW4.2@6.05,58.925 6.575,58.4 8.344,58.4 8.844,57.9 10.4,57.9 10.9,58.4 10.9,59 11.2,59.3 12.4,59.3 13.1,58.6 R255.2@13.1,55.5 R252.1@11.9,55.5
USER_LED: Q12.1 U1.E19 | length 96.2
  L1 w0.114: v1(23.2,53.7) U1.E19@23.6,53.3 ; Q12.1@33.05,4.65 33.2,4.8 v1(33.9,4.8)
  L3 w0.12: v1(33.9,4.8) 34.6,4.1 37.2,4.1 37.52,3.78 38.38,3.78 38.9,4.3 40.2,4.3 40.7,3.8 42.9,3.8 43.4,4.3 45.9,4.3 46.4,4.8 46.4,5.2 46.6,5.4 47.5,5.4 48.6,6.5 48.6,7.9 50.4,9.7 50.4,10.8 51.185,11.585 51.185,12.985 53.9,15.7 53.9,17.5 v1(54.3,17.9)
  L8 w0.12: v1(23.2,53.7) 25.215,51.685 25.215,44.771 24.959,44.515 24.671,44.515 24.415,44.259 24.415,43.971 23.329,42.885 23.041,42.885 22.8,42.644 22.8,40.756 23.056,40.5 23.344,40.5 23.585,40.259 23.585,35.571 23.9,35.256 24.656,35.256 25.1,35.7 26.6,35.7 26.785,35.515 28.329,35.515 29.215,34.629 29.215,34.141 29.441,33.915 29.785,33.915 30.915,32.785 30.915,30.685 31.115,30.485 33.115,30.485 33.4,30.2 33.4,29.244 33.6,29.044 33.6,28.1 34,27.7 34,25.5 36.915,22.585 37.559,22.585 38.1,22.044 38.1,21.356 38.656,20.8 42.4,20.8 43.5,19.7 46.2,19.7 46.885,19.015 48.885,19.015 49.4,18.5 49.755,18.5 50,18.255 50,17.8 50.2,17.6 54,17.6 v1(54.3,17.9)
USER_LED_1: R145.2 U1.A18 U6.30 | length 111.9
  L1 w0.114: v1(3.9,85) 4.4,84.5 R145.2@4.5,84.5 ; v1(6.6,22.6) 6.844,22.6 8.1,23.856 8.1,24.2 8.4,24.5 8.4,26.5 9.1,27.2 10.4,27.2 12.4,25.2 15.8,25.2 17.1,26.5 v1(17.1,26.8) ; v1(16.3,53.8) 17.273,52.827 19.373,52.827 19.7,52.5 U1.A18@20.4,52.5
  L3 w0.12: v1(2.6,59.2) 3,59.6 3.9,59.6 4.91,58.59 6.11,58.59 7.185,57.515 8.459,57.515 8.694,57.75 10.418,57.75 11.585,56.583 11.585,55.915 12.815,54.685 14.815,54.685 15.7,53.8 v1(16.3,53.8)
  L8 w0.12: 2.015,45.709 2.015,56.259 2.441,56.685 2.685,56.685 3.5,57.5 3.5,58.3 v1(2.6,59.2) 2.22,59.58 2.22,62.976 2.585,63.341 2.585,63.719 1.835,64.469 1.835,68.645 2.09,68.9 2.09,70.51 1.746,70.854 1.746,73.146 2.02,73.42 2.02,74.784 1.8,75.004 1.8,77 3.4,78.6 3.4,84.5 v1(3.9,85) ; 2.02,45.709 2.285,45.444 2.285,37.3 2,37.015 2,35.756 1.615,35.371 1.615,26.941 2,26.556 2,25.1 2.8,24.3 4.3,24.3 6,22.6 v1(6.6,22.6)
  L10 w0.114: v1(17.1,26.8) 17.185,26.885 18.459,26.885 19.4,25.944 19.4,25.185 19.685,24.9 19.685,24.541 19.575,24.431 U6.30@19.575,23.85
USER_LED_2: R165.2 R389.2 U1.C17 | length 86.7
  L1 w0.114: v1(2.9,80.9) 3.3,80.9 3.9,81.5 R165.2@4.5,81.5 ; v1(21.6,52.1) U1.C17@22,51.7
  L3 w0.12: v1(2.6,57.7) 2.9,57.4 2.9,56.6 3.88,55.62 5.38,55.62 6.1,54.9 10.3,54.9 12.245,52.955 14.569,52.955 15.024,52.5 20.8,52.5 21.2,52.1 v1(21.6,52.1)
  L8 w0.12: v1(1.1,22.6) 0.81,22.89 0.81,36.516 1.085,36.791 1.085,56.185 v1(2.6,57.7) 2.6,58 1.385,59.215 1.385,62.515 1.1,62.8 1.1,69.315 1.385,69.6 1.385,70.159 1.1,70.444 1.1,73.856 1.385,74.141 1.385,74.615 1.045,74.955 1.045,78.045 1.8,78.8 1.8,79.8 v1(2.9,80.9)
  L10 w0.114: v1(1.1,22.6) 1.6,22.6 2.1,22.1 R389.2@2.1,21.9
USER_LED_3: R176.2 R391.2 U1.F16 | length 136.9
  L1 w0.114: v1(2.9,78.9) 3.3,78.9 3.615,79.215 4.215,79.215 R176.2@4.5,79.5 ; v1(24,51.3) U1.F16@24.4,50.9
  L3 w0.12: v1(2.2,63.5) 3,62.7 3,61.4 4.8,59.6 5.9,59.6 7.215,58.285 8.615,58.285 8.84,58.06 10.584,58.06 12.5,56.144 12.5,55.6 13.1,55 15.1,55 15.885,54.215 16.715,54.215 16.9,54.4 18.8,54.4 19.085,54.115 21.729,54.115 21.985,53.859 21.985,53.571 22.656,52.9 23,52.9 23.6,52.3 23.6,51.7 v1(24,51.3)
  L8 w0.12: v1(2.9,78.9) 1.4,77.4 1.4,75.008 1.74,74.668 1.74,73.84 1.423,73.523 1.423,70.597 1.737,70.283 1.737,69.237 1.472,68.972 1.472,64.428 2.2,63.7 v1(2.2,63.5) 1.815,63.115 1.815,59.285 3,58.1 3,57.5 2.465,56.965 2.325,56.965 1.55,56.19 1.55,45.494 1.4,45.344 1.4,45 1.515,44.885 1.515,36.115 1.212,35.812 1.212,26.884 1.6,26.497 1.6,22.1 0.7,21.2 0.7,18.5 1.285,17.915 1.285,14.45 1.735,14 1.735,9.261 2.996,8 5.2,8 8.1,5.1 8.1,4 9.6,2.5 13.156,2.5 13.656,3 18.2,3 18.9,3.7 18.9,6.7 20.1,7.9 v1(20.1,11.3)
  L10 w0.114: v1(20.1,11.3) 20.6,11.8 20.6,12 21.6,13 R391.2@22.3,13
USER_LED_4: R189.2 R392.2 U1.D17 | length 47.7
  L1 w0.114: v1(3.8,78) 4.3,78.5 R189.2@4.5,78.5 ; v1(22.4,52.1) U1.D17@22.8,51.7
  L3 w0.12: v1(3.4,59.2) 3.4,57.5 3.2,57.3 3.2,56.756 4.056,55.9 4.5,55.9 4.985,56.385 5.859,56.385 6.744,55.5 8.3,55.5 8.6,55.2 10.5,55.2 12.465,53.235 14.765,53.235 15.17,52.83 20.866,52.83 21.211,52.485 22.015,52.485 v1(22.4,52.1)
  L8 w0.12: v1(3.4,59.2) 2.6,60 2.6,62.5 2.865,62.765 2.865,63.935 2.215,64.585 2.215,67.585 2.115,67.685 2.115,68.159 2.442,68.487 2.442,70.658 2.069,71.031 2.069,72.869 2.3,73.1 2.3,76.8 3.5,78 v1(3.8,78)
  L10 w0.114: R392.2@2.3,58.4 2.5,58.4 3.3,59.2 v1(3.4,59.2)
USER_LED_5: R192.2 U1.A19 | length 6.5
  L1 w0.114: R192.2@15.3,53 15.6,53 15.915,53.315 15.915,54.015 16.115,54.215 17.229,54.215 17.485,53.959 17.485,53.715 17.69,53.51 19.59,53.51 19.8,53.3 U1.A19@20.4,53.3
USER_LED_6: R193.2 U1.B18 | length 7.2
  L1 w0.114: R193.2@15.4,55.1 15.5,55 16.4,55 16.835,54.565 17.335,54.565 17.6,54.3 18.844,54.3 19.354,53.79 19.706,53.79 19.796,53.7 20.6,53.7 20.8,53.5 20.8,53.11 21.2,52.71 U1.B18@21.2,52.5
USER_LED_7: R200.2 U1.E17 | length 24.2
  L1 w0.114: v1(23.2,52.1) U1.E17@23.6,51.7
  L3 w0.12: v1(4.15,57.7) 6.1,57.7 7.1,56.7 8.1,56.7 8.84,57.44 10.332,57.44 10.78,56.992 10.78,55.976 12.411,54.344 13.2,54.344 13.644,53.9 15.1,53.9 15.585,53.415 17.3,53.415 17.4,53.515 18.915,53.515 19.2,53.8 20.956,53.8 21.456,53.3 21.744,53.3 22.434,52.61 22.69,52.61 v1(23.2,52.1)
  L10 w0.114: v1(4.15,57.7) 4.35,57.5 R200.2@4.8,57.5
USER_LED_8: R202.2 U1.C18 | length 20.9
  L1 w0.114: v1(21.6,52.9) U1.C18@22,52.5
  L3 w0.12: v1(3.6,56.9) 6.3,56.9 7.2,56 8.398,56 8.878,55.52 10.636,55.52 12.641,53.515 14.985,53.515 15.385,53.115 20.977,53.115 21.192,52.9 v1(21.6,52.9)
  L10 w0.114: R202.2@3.5,57.5 3.5,57 v1(3.6,56.9)
USER_LED_CPU_D: D21.1 R146.1 | length 4.6
  L1 w0.114: R146.1@29,6.2 29,5.4 31.6,2.8 D21.1@31.6,2.7
USER_LED_CPU_Q: Q12.3 R146.2 | length 1.7
  L1 w0.114: R146.2@30,6.2 30.5,6.2 31.15,5.55 Q12.3@31.15,5.3
USER_LED_D_1: D1.1 R145.1 | length 1.9
  L1 w0.114: D1.1@2.9,84.2 3.4,84.2 4.1,83.5 R145.1@4.5,83.5
USER_LED_D_2: D2.1 R165.1 | length 1.8
  L1 w0.114: D2.1@2.9,82 3.4,82.5 R165.1@4.5,82.5
USER_LED_D_3: D3.1 R176.1 | length 1.9
  L1 w0.114: D3.1@2.9,79.8 3.565,80.465 R176.1@4.5,80.465
USER_LED_D_4: D33.1 R189.1 | length 1.6
  L1 w0.114: D33.1@2.9,77.6 4.4,77.6 R189.1@4.5,77.5
USER_LED_D_5: D5.1 R192.1 | length 32.6
  L1 w0.114: v1(2.7,76.2) 2.9,76 D5.1@2.9,75.4 ; v1(13.8,55.8) 13.8,54.556 14.441,53.915 15.215,53.915 R192.1@15.3,54
  L3 w0.12: v1(3.8,62.2) 4.7,62.2 6,60.9 7.9,60.9 8.32,60.48 10.216,60.48 11.115,59.581 11.115,58.341 13.656,55.8 v1(13.8,55.8)
  L8 w0.12: v1(2.7,76.2) 3.1,75.8 3.1,74.444 2.715,74.059 2.715,72.815 2.392,72.492 2.392,71.208 2.795,70.805 2.795,68.372 2.885,68.282 2.885,67.841 2.6,67.556 2.6,66.804 3,66.404 3,64.4 3.2,64.2 3.2,62.8 v1(3.8,62.2)
USER_LED_D_6: D6.1 R193.1 | length 30.3
  L1 w0.114: D6.1@2.9,73.2 3.1,73.4 v1(3.1,73.9) ; R193.1@14.4,55.1 14.4,55.6 v1(14.6,55.8)
  L3 w0.12: v1(3.8,63) 3.415,62.615 3.415,61.885 4.6,60.7 5.6,60.7 6.4,59.9 8.1,59.9 8.3,60.1 10.2,60.1 10.835,59.465 10.835,58.205 13.74,55.3 14.123,55.3 v1@14.623,55.8
  L8 w0.12: v1(3.1,73.9) 3.1,72.4 2.715,72.015 2.715,71.385 3.165,70.935 3.165,67.725 3,67.56 3,66.856 3.356,66.5 3.644,66.5 3.885,66.259 3.885,65.929 3.5,65.544 3.5,65.244 3.785,64.959 3.785,64.641 3.5,64.356 3.5,63.3 v1(3.8,63)
USER_LED_D_7: D7.1 R200.1 | length 15.5
  L1 w0.114: D7.1@2.9,71 3.1,71.2 v1(3.1,71.7)
  L8 w0.12: v1(3.1,71.7) 3.5,71.3 3.5,67.456 4.285,66.671 4.285,62 3.8,61.515 3.8,58.85 v1(4.15,58.5)
  L10 w0.114: v1(4.15,58.5) R200.1@4.8,58.5
USER_LED_D_8: D34.1 R202.1 | length 13.7
  L1 w0.114: D34.1@2.9,68.8 3.3,69.2 v1(3.9,69.2)
  L8 w0.12: v1(3.9,69.2) 4.3,68.8 4.3,67.3 4.6,67 4.6,61.6 4.3,61.3 4.3,59.9 v1(5,59.2)
  L10 w0.114: R202.1@3.5,58.5 4.2,59.2 v1(5,59.2)
USER_LED_MCU: Q5.1 R204.1 U6.3 | length 16.1
  L8 w0.12: v1(22.8,21.275) 21.9,20.375 21.9,14.956 24.656,12.2 v1(25.1,12.2)
  L10 w0.114: U6.3@21.95,21.475 22.6,21.475 v1(22.8,21.275) ; v1(25.1,12.2) 25.45,12.55 Q5.1@26.35,12.55 27.45,12.55 R204.1@28.6,11.4
USER_LED_MCU_D: D24.1 R186.1 | length 8.3
  L1 w0.114: D24.1@18.5,2.7 19.4,1.8 v1(19.4,1.5)
  L10 w0.114: v1(19.4,1.5) 20,0.9 22.1,0.9 22.3,1.1 24.5,1.1 24.9,1.5 R186.1@24.9,2.2
VID_IN_CSI1_D0: J7.9 U1.M21 | length 58.1
  L1 w0.114: v1(28.8,55.3) U1.M21@29.2,54.9
  L3 w0.12: v1(3.9,65.4) 4.635,66.135 7.179,66.135 9.644,68.6 10.8,68.6 11,68.8 13.4,68.8 14,69.4 15.4,69.4 15.6,69.2 15.6,68.5 15.8,68.3 16.2,68.3 16.4,68.5 16.4,69.2 16.6,69.4 18.2,69.4 19.1,68.5 20.4,68.5 20.9,69 21.7,69 22.7,70 25.044,70 26,70.956 26,71.244 27.515,72.759 27.515,73.315 28.4,74.2 28.4,74.5 29.4,75.5 v1(30,75.5)
  L8 w0.12: v1(28.8,55.3) 28.4,55.7 28.4,56.345 28.245,56.5 27.856,56.5 27.615,56.741 27.615,59.847 27.797,60.029 27.797,62.997 28.343,63.543 28.343,67.688 29.011,68.355 29.347,68.355 30.163,69.171 30.163,72.337 29.815,72.685 29.815,75.315 v1(30,75.5)
  L10 w0.114: v1(3.9,65.4) 3.9,66 4.25,66.35 J7.9@4.85,66.35
VID_IN_CSI1_D1: J7.10 U1.L24 | length 58.1
  L1 w0.114: U1.L24@28.4,57.3 28,57.7 28,59.3 v1(28.8,60.1)
  L3 w0.12: v1(3.5,66.1) 3.868,66.468 6.413,66.468 7.944,68 8.4,68 9.4,69 10.6,69 11.185,69.585 13.041,69.585 13.241,69.785 18.415,69.785 19.335,68.865 20.165,68.865 20.8,69.5 21.6,69.5 22.9,70.8 24.756,70.8 27,73.044 27,74.3 28.8,76.1 30,76.1 30.4,76.5 v1(30.4,77.4)
  L8 w0.12: v1(28.8,60.1) 28.715,60.185 28.715,61.755 29.6,62.64 29.6,62.9 29.85,63.15 29.85,64.606 30.285,65.041 30.285,67.485 31.3,68.5 31.3,69.2 31.585,69.485 31.585,71.215 31.32,71.48 31.32,72.16 31.56,72.4 31.56,74.156 31.9,74.496 31.9,75.9 v1(30.4,77.4)
  L10 w0.114: v1(3.5,66.1) 4.25,66.85 J7.10@4.85,66.85
VID_IN_CSI1_D2: J7.11 U1.L25 | length 58
  L1 w0.114: U1.L25@28.4,58.1 28.4,58.9 v1(28.8,59.3)
  L3 w0.12: v1(3.5,66.9) 3.598,66.802 6.202,66.802 6.8,67.4 6.8,68.3 6.985,68.485 8.385,68.485 9.3,69.4 10.1,69.4 10.6,69.9 12.4,69.9 12.623,70.123 18.677,70.123 19.165,69.635 20.335,69.635 20.7,70 21.5,70 22.697,71.197 24.297,71.197 25,71.9 25.3,71.9 26.567,73.167 26.567,74.767 28,76.2 28,76.6 28.2,76.8 29,76.8 v1(30.4,78.2)
  L8 w0.12: v1(28.8,59.3) 28.8,59.556 29.185,59.941 29.185,60.641 29.485,60.941 29.485,61.271 29.215,61.541 29.215,61.859 30.2,62.844 30.2,64.435 30.565,64.8 30.565,67.265 31.92,68.62 31.92,73.12 32.3,73.5 32.3,76.004 30.785,77.519 30.785,77.815 v1(30.4,78.2)
  L10 w0.114: v1(3.5,66.9) 3.785,66.9 4.235,67.35 J7.11@4.85,67.35
VID_IN_CSI1_D3: J7.12 U1.K25 | length 58.1
  L1 w0.114: v1(26.8,60.4) 27.6,59.6 U1.K25@27.6,58.1
  L3 w0.12: v1(3.9,67.6) 4.365,67.135 5.765,67.135 5.965,67.335 5.965,67.735 5.765,67.935 4.635,67.935 4.435,68.135 4.435,68.535 4.635,68.735 6.435,68.735 6.7,69 7.035,69 7.27,68.765 8.165,68.765 8.4,69 8.4,69.8 8.6,70 9.015,70 9.2,69.815 9.715,69.815 9.9,70 9.9,70.4 10.1,70.6 10.8,70.6 11.185,70.215 11.341,70.215 11.715,70.215 11.962,70.462 13.662,70.462 14,70.8 14.6,70.8 14.938,70.462 18.938,70.462 19.485,69.915 19.915,69.915 20.3,70.3 21.2,70.3 22.494,71.594 23.994,71.594 24.7,72.3 25.1,72.3 26.133,73.333 26.133,75.237 28.096,77.2 v1(28.4,77.2)
  L8 w0.12: v1(26.8,60.4) 26.415,60.785 26.415,62.885 26.109,63.191 26.109,67.744 27.215,68.85 27.215,69.359 27.441,69.585 27.985,69.585 28.415,70.015 28.415,71.559 28.897,72.041 28.897,76.447 28.4,76.944 v1(28.4,77.2)
  L10 w0.114: v1(3.9,67.6) 4.15,67.85 J7.12@4.85,67.85
VID_IN_CSI1_D4: J7.14 U1.L23 | length 58.1
  L1 w0.114: v1(28,56.9) U1.L23@28.4,56.5
  L3 w0.12: v1(3.9,68.4) 3.515,68.785 3.515,69.359 3.741,69.585 4.185,69.585 4.735,70.135 6.035,70.135 6.5,70.6 8.3,70.6 9.2,71.5 10.1,71.5 10.233,71.367 11.767,71.367 12.355,71.955 15.245,71.955 15.6,71.6 20.2,71.6 20.5,71.3 21,71.3 22.089,72.389 23.183,72.389 24.394,73.6 24.6,73.6 25.1,74.1 25.1,74.464 24.9,74.664 24.9,75 28.7,78.8 v1(28.7,78.9)
  L8 w0.12: v1(28,56.9) 28,59.836 28.103,59.939 28.103,62.087 28.322,62.306 28.322,62.922 28.715,63.315 28.715,66.971 30.489,68.745 30.489,72.517 30.2,72.806 30.2,73.1 30.585,73.485 30.585,73.809 30.415,73.979 30.415,74.321 30.585,74.491 30.585,75.515 30.192,75.908 30.192,76.408 29.685,76.915 29.685,78.415 29.2,78.9 v1(28.7,78.9)
  L10 w0.114: v1(3.9,68.4) 3.9,68.5 4.25,68.85 J7.14@4.85,68.85
VID_IN_CSI1_D5: J7.15 U1.L22 | length 58.1
  L1 w0.114: U1.L22@28.4,55.7 v1(28.8,56.1)
  L3 w0.12: v1(3.9,70) 4.365,70.465 5.865,70.465 6.4,71 8.056,71 9.356,72.3 9.9,72.3 10.467,71.733 11.533,71.733 12.115,72.315 15.88,72.315 16.195,72 21.2,72 21.986,72.786 22.986,72.786 24.182,73.982 24.182,74.838 27.985,78.641 27.985,78.93 28.456,79.4 29.4,79.4 v1(29.9,78.9)
  L8 w0.12: v1(28.8,56.1) 28.8,56.356 28.409,56.747 28.409,61.845 29.185,62.621 29.185,62.971 29.5,63.286 29.5,67.2 30.815,68.515 30.815,72.515 31.185,72.885 31.185,74.715 31,74.9 31,76.1 30.015,77.085 30.015,78.785 v1(29.9,78.9)
  L10 w0.114: v1(3.9,70) 3.9,69.744 4.294,69.35 J7.15@4.85,69.35
VID_IN_CSI1_D6: J7.16 U1.K24 | length 58
  L1 w0.114: v1(26.8,59.6) 27.2,59.2 27.2,57.7 U1.K24@27.6,57.3
  L3 w0.12: v1(5.7,69.75) 5.6,69.85 4.9,69.85 4.7,69.65 4.7,69.25 4.9,69.05 6.25,69.05 6.4,69.2 6.4,70 6.6,70.2 7,70.2 7.2,70 7.2,69.3 7.4,69.1 7.8,69.1 8,69.3 8,70.1 8.22,70.32 8.82,70.32 9.1,70.6 9.644,70.6 10.044,71 11.8,71 11.985,70.815 13.421,70.815 13.7,71.094 13.7,71.4 13.894,71.594 14.706,71.594 15,71.3 15,71 15.2,70.8 15.6,70.8 15.9,71.1 16.356,71.1 16.641,70.815 17.115,70.815 17.4,71.1 17.8,71.1 18.085,70.815 18.615,70.815 18.9,71.1 19.5,71.1 19.9,70.7 21,70.7 22.291,71.991 23.591,71.991 24.3,72.7 24.9,72.7 25.7,73.5 25.7,75.3 28.4,78 v1(28.5,78)
  L8 w0.12: v1(26.8,59.6) 26.8,59.824 27.185,60.209 27.185,63.485 27.6,63.9 27.6,67.874 28.641,68.915 28.959,68.915 29.511,69.467 29.511,71.789 29.203,72.097 29.203,76.537 28.8,76.94 28.8,77.344 28.5,77.644 v1(28.5,78)
  L10 w0.114: J7.16@4.85,69.85 5.6,69.85 v1(5.7,69.75)
VID_IN_CSI1_D7: J7.17 U1.L21 | length 58.1
  L1 w0.114: v1(28,55.3) U1.L21@28.4,54.9
  L3 w0.12: v1(3.9,70.8) 4.2,71.1 5.2,71.1 5.475,71.375 7.875,71.375 9.2,72.7 10.2,72.7 10.8,72.1 11.3,72.1 11.6,72.4 11.6,72.8 11.9,73.1 13.6,73.1 13.8,73.3 16,73.3 16.2,73.1 16.2,72.7 16.4,72.5 16.8,72.5 17,72.7 17,73.1 17.2,73.3 17.6,73.3 18.48,72.42 18.92,72.42 19.44,72.94 20.94,72.94 21.183,73.183 22.783,73.183 23.832,74.233 23.832,75.032 v1(27.6,78.8)
  L8 w0.12: v1(27.6,78.8) 27.6,76.2 28,75.8 28,74.904 28.285,74.619 28.285,72.885 28,72.6 28,72.1 27.627,71.727 27.627,70.871 26.6,69.844 26.6,69.4 25.302,68.102 25.302,63.098 25.805,62.595 25.805,60.575 26.04,60.34 26.04,58.86 26.815,58.085 26.815,56.741 27.056,56.5 27.344,56.5 27.585,56.259 27.585,55.715 v1(28,55.3)
  L10 w0.114: v1(3.9,70.8) 4.35,70.35 J7.17@4.85,70.35
VID_IN_CSI1_D8: J7.19 U1.J25 | length 58.1
  L1 w0.114: U1.J25@26.8,58.1 v1(26.8,58.8)
  L3 w0.12: v1(3.9,71.6) 3.515,71.985 3.515,74.159 3.741,74.385 5.785,74.385 6.3,74.9 7,74.9 7.5,75.4 7.5,75.8 8.6,76.9 9.1,76.9 9.3,76.7 10,76.7 10.163,76.863 10.163,77.4 10.738,77.975 12.175,77.975 12.287,78.087 15.712,78.087 16,77.8 16.659,77.8 16.947,78.087 17.787,78.087 18.075,77.8 18.5,77.8 18.675,77.975 19.8,77.975 20.075,77.7 20.6,77.7 20.875,77.975 23.675,77.975 24.5,78.8 25.932,78.8 26.732,79.6 27.864,79.6 28.1,79.836 28.1,80.3 v1(28.5,80.7)
  L8 w0.12: v1(26.8,58.8) 26.4,59.2 26.4,60.39 26.11,60.68 26.11,62.703 25.705,63.107 25.705,67.905 26.88,69.08 26.88,69.42 27.375,69.915 27.759,69.915 28.021,70.176 28.021,71.621 28.591,72.191 28.591,74.859 28.4,75.05 28.4,75.856 28.015,76.241 28.015,80.215 v1(28.5,80.7)
  L10 w0.114: v1(3.9,71.6) 4.15,71.35 J7.19@4.85,71.35
VID_IN_CSI1_D9: J7.20 U1.L20 | length 58.1
  L1 w0.114: v1(28,54.5) U1.L20@28.4,54.1
  L3 w0.12: v1(5.7,71.85) 6.15,71.85 6.3,71.7 7.6,71.7 9,73.1 10.54,73.1 11.02,73.58 14.68,73.58 15,73.9 15.68,73.9 15.989,73.591 17.865,73.591 18.456,73 18.8,73 19.38,73.58 22.667,73.58 23.5,74.413 23.5,75.4 v1(25.7,77.6)
  L8 w0.12: v1(25.7,77.6) 25.7,76 26.295,75.405 26.295,72.895 25.7,72.3 25.2,72.3 23.815,70.915 23.815,70.271 23.5,69.956 22.956,69.956 22.515,69.515 22.515,64.1 22.415,64 22.415,62.659 22.415,62.341 22.641,62.115 23.255,62.115 23.985,61.385 23.985,57.468 24.395,57.058 24.395,55.905 24.615,55.685 24.959,55.685 25.185,55.459 25.185,53.215 25.9,52.5 26.544,52.5 26.8,52.756 26.8,53.3 v1(28,54.5)
  L10 w0.114: J7.20@4.85,71.85 v1(5.7,71.85)